# Altium PCB PCB_Sonography-v1.0.PcbDoc (part 2 of 3)
Units mil, origin at the board's own origin, x right, y up, seen from the top; angles counter-clockwise.
Board outline 1550.13 x 1118 mil, 4 copper layers (Top Layer, GND/Signal, PWR/Signal, Bottom Layer), stack 62.449 mil thick; 109 components, 55 nets, 355 pads, 157 vias.
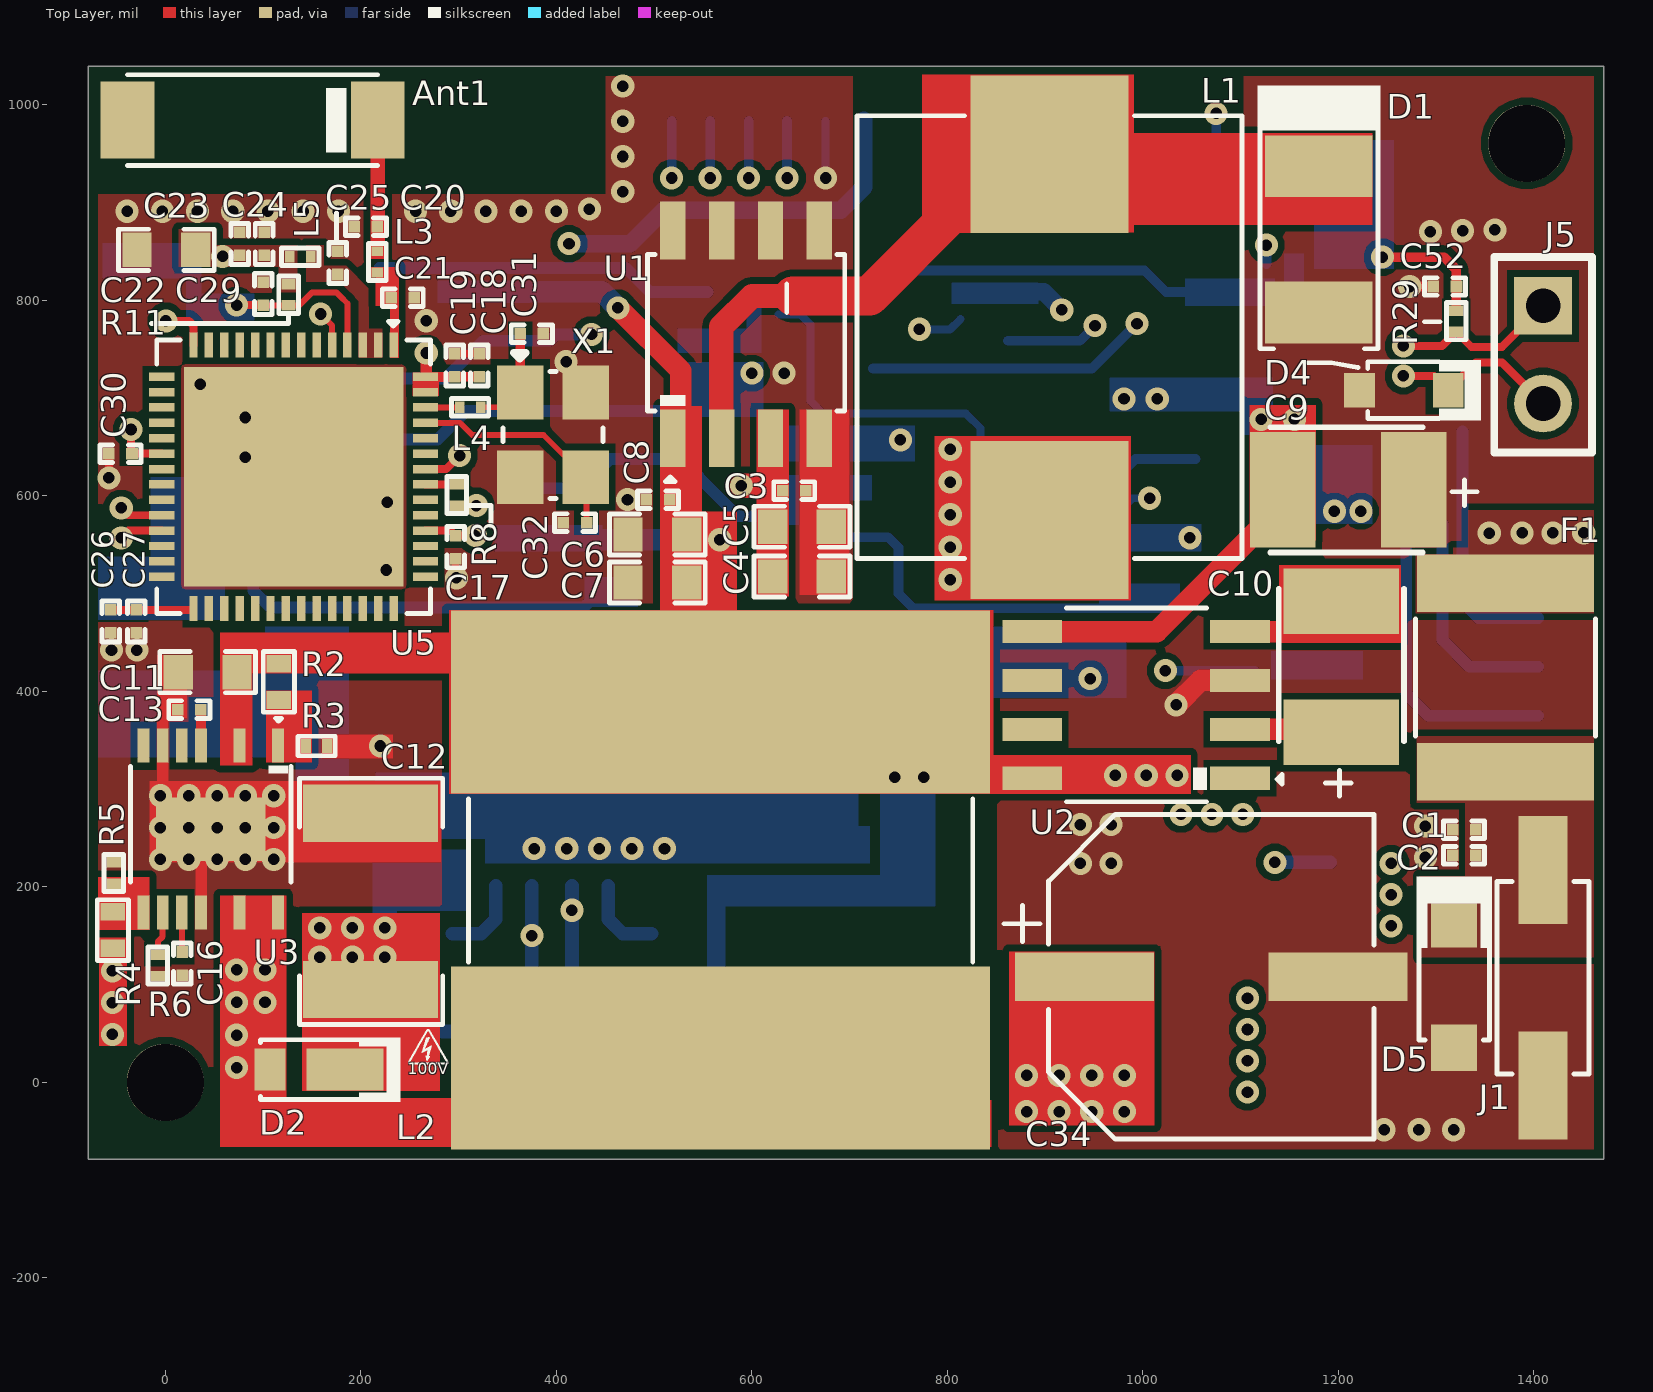
[diagram p0: Top Layer view]

## Part data (continued)
R15 R16: library part AC0402FR-070RL, "RESISTOR 0402 JUMPER ZERO OHM", Case Code (Imperial)=0402, Case Code (Metric)=1005, LCSC Part Number=C226739, Manufacturer=Yageo, Max Operating Temperature=155°C, Min Operating Temperature=-55°C, Power Rating=62.5mW, Supplier Part Number=13-AC0402FR-070RLDKR-ND, Temperature Coefficient=200ppm/°C, Tolerance=1%, Voltage Rating=50V, Case/Package=0402, Category="Chip SMD Resistors", ComponentLink1Description=https://datasheet.ciiva.com/12656/pyu-ac-51-rohs-l-2-12656734.pdf?src-supplier=Mouser, ComponentLink1URL=https://datasheet.ciiva.com/12656/pyu-ac-51-rohs-l-2-12656734.pdf?src-supplier=Mouser, ComponentLink2Description=LCSC, ComponentLink2URL=https://www.lcsc.com/product-detail/Chip-Resistor-Surface-Mount_YAGEO-AC0402FR-070RL_C226739.html, Height=370um, Item Type=Resistor, Manufacturer Part Number=AC0402FR-070RL, Packaging="Tape and Reel", Pricing="1=0.1, 10=0.017, 25=0.0132, 50=0.01, 100=0.0071, 250=0.00568, 500=0.00454, 1000=0.00335, 5000=0.0024 (USD)", RoHS=Yes, Series=AC, Stock=337140, Supplier=Digi-Key, Termination=SMD/SMT
R17: library part ESR03EZPJ103, "RES SMD 10K OHM 5% 1/4W 0603", LCSC Part Number=C253330, Manufacturer="ROHM Semicon", Package=0603, ComponentLink1Description=LCSC, ComponentLink1URL=https://www.lcsc.com/product-detail/Chip-Resistor-Surface-Mount_ROHM-Semicon-ESR03EZPJ103_C253330.html, Item Type=Resistor, Manufacturer Part Number=ESR03EZPJ103
R20: library part 0201WMJ0680TEE, "50mW Thick Film Resistors ±5% ±200ppm/℃ 68Ω 0201 Chip Resistor - Surface Mount ROHS", LCSC Part Number=C473576, Manufacturer=UNI-ROYAL, ComponentLink1Description=LCSC, ComponentLink1URL=https://www.lcsc.com/product-detail/Chip-Resistor-Surface-Mount_UNI-ROYAL-Uniroyal-Elec-0201WMJ0680TEE_C473576.html, Item Type=Resistor, Manufacturer Part Number=0201WMJ0680TEE
R21: library part WR02X821JAL, "50mW Thick Film Resistors ±200ppm/℃ ±5% 820Ω 0201 Chip Resistor - Surface Mount ROHS", LCSC Part Number=C180347, Manufacturer="Walsin Tech Corp", Package=0201, ComponentLink1Description=LCSC, ComponentLink1URL=https://www.lcsc.com/product-detail/Chip-Resistor-Surface-Mount_Walsin-Tech-Corp-WR02X821JAL_C180347.html, Item Type=Resistor, Manufacturer Part Number=WR02X821JAL
R22 R26: library part RC-01W3300FT, "50mW ±1% ±200ppm/℃ 330Ω 0201 Chip Resistor - Surface Mount ROHS", LCSC Part Number=C320833, Manufacturer=FH, ComponentLink1Description=LCSC, ComponentLink1URL=https://www.lcsc.com/product-detail/Chip-Resistor-Surface-Mount_FH-Guangdong-Fenghua-Advanced-Tech-RC-01W3300FT_C320833.html, Item Type=Resistor, Manufacturer Part Number=RC-01W3300FT
R23: library part RC-01W471JT, "50mW ±5% ±200ppm/℃ 470Ω 0201 Chip Resistor - Surface Mount ROHS", LCSC Part Number=C304545, Manufacturer=FH, Package=0201, ComponentLink1Description=LCSC, ComponentLink1URL=https://www.lcsc.com/product-detail/Chip-Resistor-Surface-Mount_FH-Guangdong-Fenghua-Advanced-Tech-RC-01W471JT_C304545.html, Item Type=Resistor, Manufacturer Part Number=RC-01W471JT
R24: library part TC33X-2-104E, "TRIMMER 100K OHM 0.1W J LEAD TOP", Color=Silver, LCSC Part Number=C719186, Manufacturer=Bourns, Max Operating Temperature=100°C, Max Power Dissipation=100mW, Min Operating Temperature=-40°C, Package Quantity=2500, Resistance=100kR, Resistance Tolerance=25%, Resistor Type=Carbon,Cermet, Temperature Coefficient=250ppm/°C, Voltage Rating (DC)=50V, Category="Variable Resistors and Potentiometers", ComponentLink1Description=https://datasheet.ciiva.com/11832/0900766b802749b3-11832506.pdf?src-supplier=RSComponents, ComponentLink1URL=https://datasheet.ciiva.com/11832/0900766b802749b3-11832506.pdf?src-supplier=RSComponents, ComponentLink2Description=https://datasheet.ciiva.com/8700/tc33-8700395.pdf?src-supplier=Avnet, ComponentLink2URL=https://datasheet.ciiva.com/8700/tc33-8700395.pdf?src-supplier=Avnet, ComponentLink3Description=https://datasheet.ciiva.com/2155/tc33-2155965.pdf?src-supplier=Digi-Key, ComponentLink3URL=https://datasheet.ciiva.com/2155/tc33-2155965.pdf?src-supplier=Digi-Key, ComponentLink4Description=https://datasheet.ciiva.com/7953/1818686-7953181.pdf?src-supplier=Element14, ComponentLink4URL=https://datasheet.ciiva.com/7953/1818686-7953181.pdf?src-supplier=Element14, ComponentLink5Description=https://datasheet.ciiva.com/16716/70155234-16716301.pdf?src-supplier=Allied+Electronics, ComponentLink5URL=https://datasheet.ciiva.com/16716/70155234-16716301.pdf?src-supplier=Allied+Electronics, ComponentLink6Description=https://datasheet.ciiva.com/2155/tc33-2155966.pdf?src-supplier=Digi-Key, ComponentLink6URL=https://datasheet.ciiva.com/2155/tc33-2155966.pdf?src-supplier=Digi-Key, ComponentLink7Description=https://datasheet.ciiva.com/7953/1818686-7953182.pdf?src-supplier=Element14, ComponentLink7URL=https://datasheet.ciiva.com/7953/1818686-7953182.pdf?src-supplier=Element14, ComponentLink8Description=https://datasheet.ciiva.com/2155/tc33-2155967.pdf?src-supplier=Digi-Key, ComponentLink8URL=https://datasheet.ciiva.com/2155/tc33-2155967.pdf?src-supplier=Digi-Key, Depth=3.8mm, Height=0.047inch, Item Type=Potentiometer, Length=3mm, Manufacturer Part Number=TC33X-2-104E, Military Standard=Not, Mount="Surface Mount", Number of Turns=1, Packaging="Tape and Reel", Power Rating=100mW, Pricing 1="2500=0.15500, 5000=0.13130 (USD)", Radiation Hardening=No, REACH SVHC="No SVHC", RoHS=Yes, RoHS Compliant=Yes, Series=TC33, Stock 1=12500, Supplier 1="Arrow Electronics", Supplier Part Number 1=TC33X-2-104E, Termination="Foot Print", Tolerance=25%, Weight=29.4mg, Width=0.118inch
R27: library part RTT01152JTH, "50mW Thick Film Resistors ±5% ±200ppm/℃ 1.5kΩ 0201 Chip Resistor - Surface Mount ROHS", LCSC Part Number=C102694, Manufacturer=RALEC, Package=0201, ComponentLink1Description=LCSC, ComponentLink1URL=https://www.lcsc.com/product-detail/Chip-Resistor-Surface-Mount_RALEC-RTT01152JTH_C102694.html, Item Type=Resistor, Manufacturer Part Number=RTT01152JTH
R28: library part RC0201FR-071KL, "RES 1K OHM 1% 1/20W 0201", Case Code (Imperial)=0201, Case Code (Metric)=0603, LCSC Part Number=C138165, Manufacturer=Yageo, Max Operating Temperature=125°C, Max Power Dissipation=50mW, Min Operating Temperature=-55°C, Package Quantity=10000, Resistance Tolerance=1%, Resistor Type="Thick Film", Supplier Part Number=311-1KMCT-ND, Temperature Coefficient=200ppm/°C, Voltage Rating=25V, Case/Package=0201, Category="Chip SMD Resistors", ComponentLink1Description=https://datasheet.ciiva.com/7672/1563626-7672204.pdf?src-supplier=Element14, ComponentLink1URL=https://datasheet.ciiva.com/7672/1563626-7672204.pdf?src-supplier=Element14, ComponentLink2Description=https://datasheet.ciiva.com/22698/1563626-22698505.pdf?src-supplier=Element14, ComponentLink2URL=https://datasheet.ciiva.com/22698/1563626-22698505.pdf?src-supplier=Element14, ComponentLink3Description=https://datasheet.ciiva.com/29721/pyu-r-int-thick-7-29721196.pdf?src-supplier=Digi-Key, ComponentLink3URL=https://datasheet.ciiva.com/29721/pyu-r-int-thick-7-29721196.pdf?src-supplier=Digi-Key, ComponentLink4Description=https://datasheet.ciiva.com/29721/pyu-r-int-thick-7-29721195.pdf?src-supplier=Digi-Key, ComponentLink4URL=https://datasheet.ciiva.com/29721/pyu-r-int-thick-7-29721195.pdf?src-supplier=Digi-Key, ComponentLink5Description=https://datasheet.ciiva.com/8896/pyu-rc0201-51-rohs-l-8-8896174.pdf?src-supplier=Avnet, ComponentLink5URL=https://datasheet.ciiva.com/8896/pyu-rc0201-51-rohs-l-8-8896174.pdf?src-supplier=Avnet, Construction=Rectangular, Contact Plating=Tin,Matte, Depth=0.3mm, Features="Moisture Resistant", Height=0.01inch, Item Type=Resistor, Lead Free=5697LeadFree, Length=0.024inch, Manufacturer Part Number=RC0201FR-071KL, Military Standard=Not, Number of Terminations=2, Packaging="Tape and Reel", Power Rating=50mW, Pricing="1=0.1, 10=0.027, 50=0.0172, 100=0.0143, 500=0.00988, 1000=0.00854, 5000=0.00629 (USD)", Reach SVHC Compliant=Unknown, RoHS=Yes, RoHS Compliant=Yes, Series=RC, Stock=5606340, Supplier=Digi-Key, Technology="THICK FILM", Termination=SMD/SMT, Tolerance=1%, Voltage Rating (DC)=25V, Width=0.012inch, Working Voltage=25V
R29: library part CR0201FH1000G, "50mW ±1% 100Ω 0201 Chip Resistor - Surface Mount ROHS", LCSC Part Number=C3036998, Manufacturer="LIZ ELEC", Package=0201, ComponentLink1Description=LCSC, ComponentLink1URL=https://www.lcsc.com/product-detail/Chip-Resistor-Surface-Mount_LIZ-Elec-CR0201FH1000G_C3036998.html, Item Type=Resistor, Manufacturer Part Number=CR0201FH1000G